# Altium PCB ide_podule-16bit.PcbDoc (part 1 of 2)
Units mm, origin at the board's own origin, x right, y up, seen from the top; angles counter-clockwise.
Board outline 101.85 x 63.25 mm, 2 copper layers (F.Cu, B.Cu); 33 components, 144 nets, 438 pads, 182 vias.
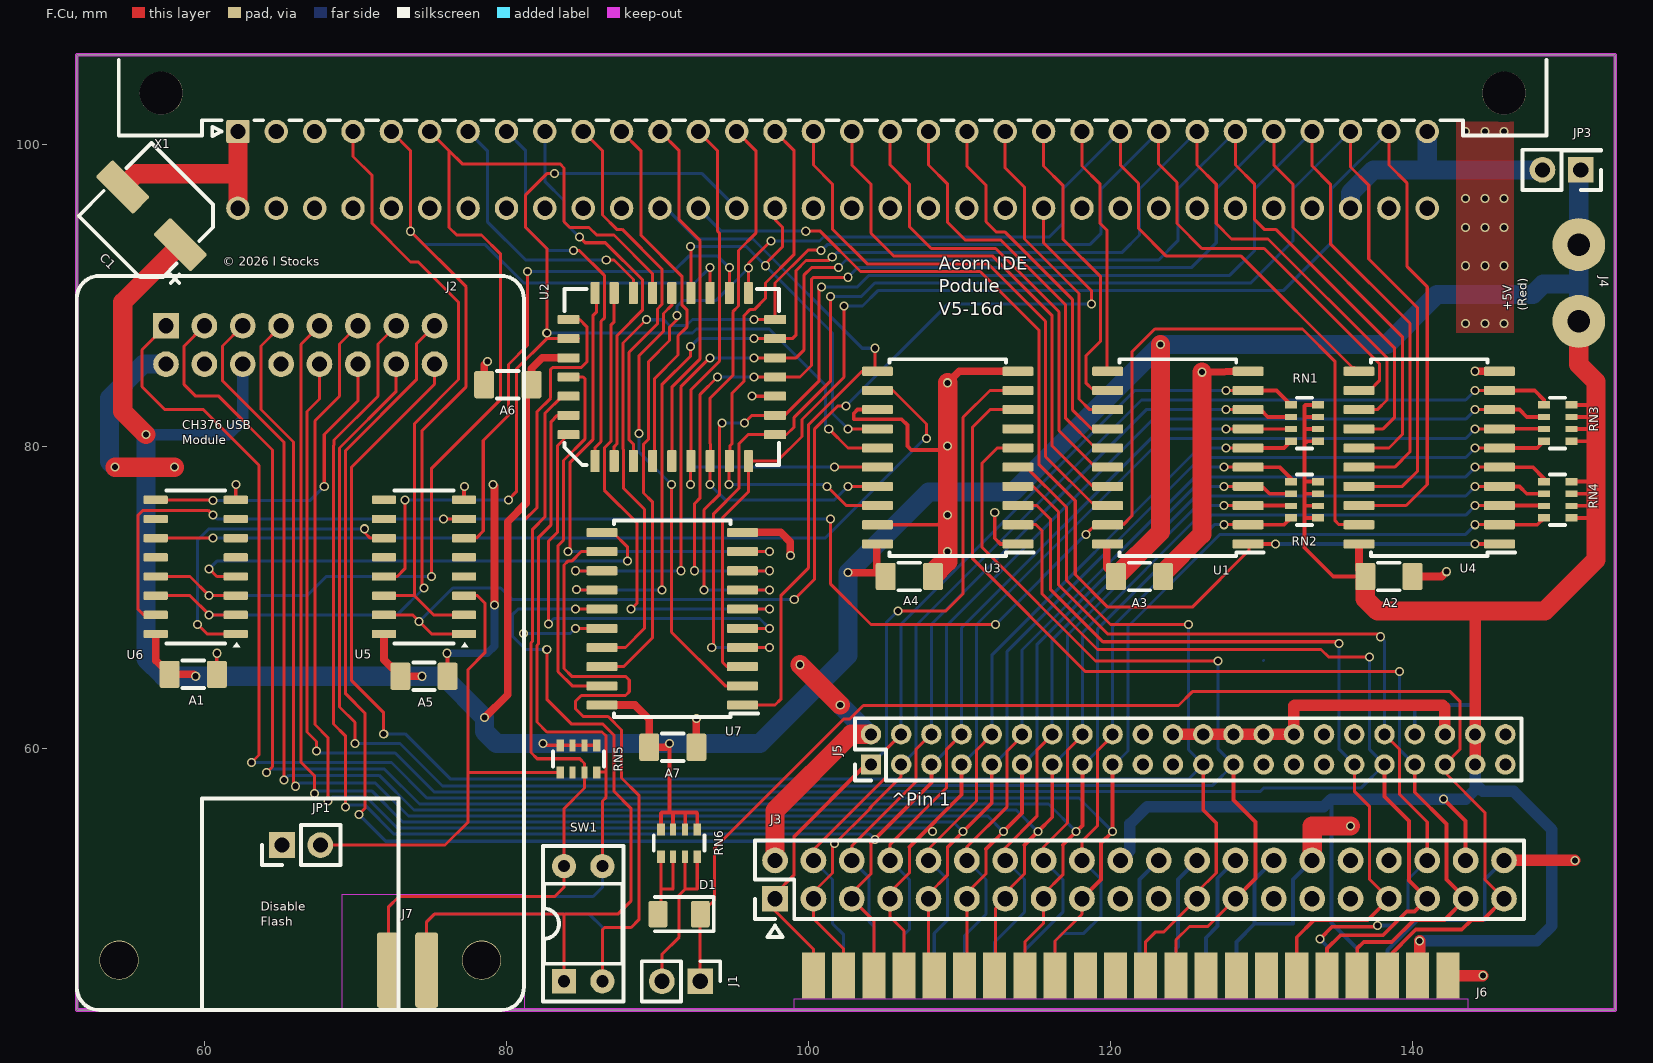
[diagram p0: F.Cu view]
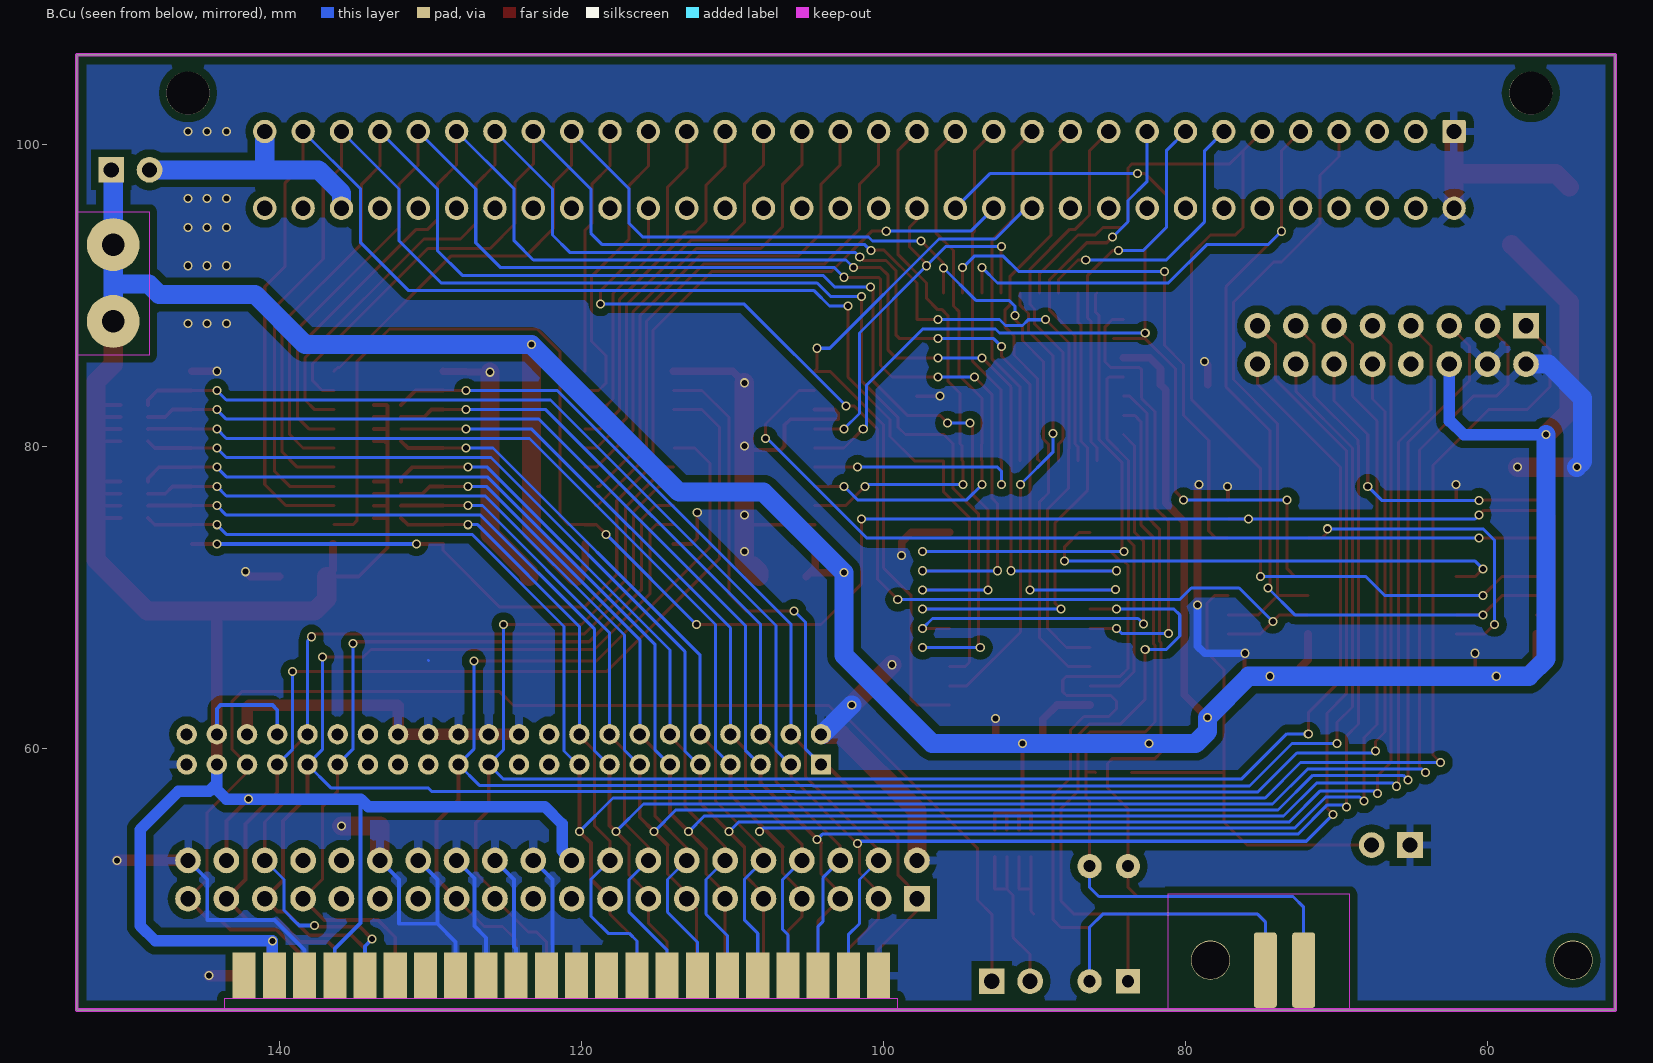
[diagram p1: B.Cu view, seen from below]

## Layer stack, top to bottom
F.Mask: solder mask 0.0102, Solder Resist, Dk 3.5
F.Cu: signal copper 0.0356
Dielectric 1: dielectric 0.32, FR-4, Dk 4.8
B.Cu: signal copper 0.0356
B.Mask: solder mask 0.0102, Solder Resist, Dk 3.5

## Board outline
51.562,42.684 153.416,42.684 153.416,105.93 51.562,105.93 51.562,42.684

## Design rules (kind name [scope] priority, off if disabled: settings)
Clearance "Clearence 0.508_Polygon" [InNamedPolygon('F.Cu-GND') OR InNamedPolygon('F.Cu-GND-1') OR InNamedPolygon('B.Cu-GND')] p1: gap=0.508 ignorepadtopadclearanceinfootprint=FALSE
Clearance "Clearence 0.2_NetClass" [InNetClass('Default') OR InNetClass('Power')] p2: gap=0.2 ignorepadtopadclearanceinfootprint=FALSE
MinimumSolderMaskSliver [All] p1: minsoldermaskwidth=0
PolygonConnect Polygon_B.Cu-GND_ConnectDirect [IsNamedPolygon('B.Cu-GND') vs IsVia] p1: connectstyle=Direct reliefconductorwidth=0.254 reliefentries=4 polygonreliefangle="90 Angle" airgapwidth=0.254
PolygonConnect Polygon_B.Cu-GND_ConnectRelief45 [IsNamedPolygon('B.Cu-GND') vs (IsThruPin or IsSMTPin) and (PadShape_AllLayers = 'Round')] p2: connectstyle=Relief reliefconductorwidth=0.508 reliefentries=4 polygonreliefangle="45 Angle" airgapwidth=0.508
PolygonConnect Polygon_B.Cu-GND_ConnectRelief90 [IsNamedPolygon('B.Cu-GND') vs (IsThruPin or IsSMTPin) and (PadShape_AllLayers <> 'Round')] p3: connectstyle=Relief reliefconductorwidth=0.508 reliefentries=4 polygonreliefangle="90 Angle" airgapwidth=0.508
PolygonConnect Polygon_F.Cu-GND-1_ConnectDirect [IsNamedPolygon('F.Cu-GND-1') vs IsVia] p4: connectstyle=Direct reliefconductorwidth=0.254 reliefentries=4 polygonreliefangle="90 Angle" airgapwidth=0.254
PolygonConnect Polygon_F.Cu-GND-1_ConnectRelief45 [IsNamedPolygon('F.Cu-GND-1') vs (IsThruPin or IsSMTPin) and (PadShape_AllLayers = 'Round')] p5: connectstyle=Relief reliefconductorwidth=0.508 reliefentries=4 polygonreliefangle="45 Angle" airgapwidth=0.508
PolygonConnect Polygon_F.Cu-GND-1_ConnectRelief90 [IsNamedPolygon('F.Cu-GND-1') vs (IsThruPin or IsSMTPin) and (PadShape_AllLayers <> 'Round')] p6: connectstyle=Relief reliefconductorwidth=0.508 reliefentries=4 polygonreliefangle="90 Angle" airgapwidth=0.508
PolygonConnect Polygon_F.Cu-GND_ConnectDirect [IsNamedPolygon('F.Cu-GND') vs IsVia] p7: connectstyle=Direct reliefconductorwidth=0.254 reliefentries=4 polygonreliefangle="90 Angle" airgapwidth=0.254
PolygonConnect Polygon_F.Cu-GND_ConnectRelief45 [IsNamedPolygon('F.Cu-GND') vs (IsThruPin or IsSMTPin) and (PadShape_AllLayers = 'Round')] p8: connectstyle=Relief reliefconductorwidth=0.508 reliefentries=4 polygonreliefangle="45 Angle" airgapwidth=0.508
PolygonConnect Polygon_F.Cu-GND_ConnectRelief90 [IsNamedPolygon('F.Cu-GND') vs (IsThruPin or IsSMTPin) and (PadShape_AllLayers <> 'Round')] p9: connectstyle=Relief reliefconductorwidth=0.508 reliefentries=4 polygonreliefangle="90 Angle" airgapwidth=0.508
RoutingVias [All] p1: holewidth=0.711 width=1.27 viastyle="Through Hole" minholewidth=0.711 minwidth=1.27 maxholewidth=0.711 maxwidth=1.27
SilkToSilkClearance [All] p1: silktosilkclearance=0
SilkToSolderMaskClearance [IsPad] p1: minsilkscreentomaskgap=0 clearancetoexposedcopper=TRUE
SolderMaskExpansion [All] p1: expansion=0 istentingtop=FALSE
Width [All] p1: maxlimit=10 minlimit=0.254 preferedwidth=0.2 minimp=50.000000 maximp=50.000000 favimp=50.000000
27 further rules are at their usual default settings.

## Classes and differential pairs
net class Power: GND VCC
net class Default: BCS0 BD0 BD1 BD2 BD3 BD4 BD5 BD6 BD7 BD8 BD9 BD10 BD11 BD12 BD13 BD14 BD15 BLA2 BLA3 BLA4 C0 C1 C2 C3 C4 C5 C6 C7 CLK1 CS0 D0 D1 D2 D3 D4 D5 D6 D7 D8 D9 D10 D11 D12 D13 D14 D15 F_CE F_Enable LA2 LA3 LA4 LA5 LA6 LA7 LA8 LA9 LA10 LA11 LA12 LA13 LA14 LA15 Net-(D1-A) Net-(D1-K) Net-(J1-P2) Net-(J7-Pin_1) Net-(J7-Pin_3) Net-(U5B-O1) Net-(X1-Pin_a32) PR{slash}{\W\}\ U2K unconnected-(J2-Pin_8-Pad8) unconnected-(J3-P19-Pad19) unconnected-(J3-P21-Pad21) unconnected-(J3-P27-Pad27) unconnected-(J3-P29-Pad29) unconnected-(J3-P31-Pad31) unconnected-(J3-P32-Pad32) unconnected-(J3-P34-Pad34) unconnected-(J5-P19-Pad19) unconnected-(J5-P20-Pad20) unconnected-(J5-P21-Pad21) unconnected-(J5-P27-Pad27) unconnected-(J5-P29-Pad29) unconnected-(J5-P31-Pad31) unconnected-(J5-P32-Pad32) unconnected-(J5-P34-Pad34) unconnected-(J5-P44-Pad44) unconnected-(J6-P19-Pad19) unconnected-(J6-P20-Pad20) unconnected-(J6-P21-Pad21) unconnected-(J6-P27-Pad27) unconnected-(J6-P29-Pad29) unconnected-(J6-P31-Pad31) unconnected-(J6-P32-Pad32) unconnected-(J6-P34-Pad34) unconnected-(J6-P44-Pad44) unconnected-(RN5-R3.2-Pad6) unconnected-(U3-A5-Pad7) unconnected-(U5A-O0-Pad4) unconnected-(U5A-O1-Pad5) unconnected-(U5B-O0-Pad12) unconnected-(U5B-O2-Pad10) unconnected-(U5B-O3-Pad9) unconnected-(U6A-O1-Pad5) unconnected-(U6A-O2-Pad6) unconnected-(U6A-O3-Pad7) unconnected-(U6B-O0-Pad12) unconnected-(U6B-O2-Pad10) unconnected-(X1-Pin_c2-Padc2) unconnected-(X1-Pin_c3-Padc3) unconnected-(X1-Pin_c4-Padc4) unconnected-(X1-Pin_c5-Padc5) unconnected-(X1-Pin_c6-Padc6) unconnected-(X1-Pin_c7-Padc7) unconnected-(X1-Pin_c8-Padc8) unconnected-(X1-Pin_c9-Padc9) unconnected-(X1-Pin_c10-Padc10) unconnected-(X1-Pin_c11-Padc11) unconnected-(X1-Pin_c16-Padc16) unconnected-(X1-Pin_c17-Padc17) unconnected-(X1-Pin_c18-Padc18) unconnected-(X1-Pin_c19-Padc19) unconnected-(X1-Pin_c20-Padc20) unconnected-(X1-Pin_c21-Padc21) unconnected-(X1-Pin_c23-Padc23) unconnected-(X1-Pin_c24-Padc24) unconnected-(X1-Pin_c25-Padc25) unconnected-(X1-Pin_c26-Padc26) unconnected-(X1-Pin_c27-Padc27) unconnected-(X1-Pin_c28-Padc28) unconnected-(X1-Pin_c29-Padc29) unconnected-(X1-Pin_c31-Padc31) unconnected-(X1-Pin_c32-Padc32) {\B\I\O\R\D\}\ {\B\I\O\W\R\}\ {\I\O\R\D\}\ {\I\O\W\R\}\ {\P\S\}\ {\R\S\T\-\B\}\ {\R\S\T\}\ {\U\S\B\_\C\S\}\

## Components (designator, comment, footprint, x,y, rotation, side; value= is the part's Value field where it differs from the comment)
A1 "Comment" C_1206_3216Metric_Pad1.33x1.80mm_HandSolder 59.271,64.909 r0 top value=100n
A2 "Comment" C_1206_3216Metric_Pad1.33x1.80mm_HandSolder 138.43,71.386 r0 top value=100n
A3 "Comment" C_1206_3216Metric_Pad1.33x1.80mm_HandSolder 121.92,71.386 r0 top value=100n
A4 "Comment" C_1206_3216Metric_Pad1.33x1.80mm_HandSolder 106.68,71.386 r0 top value=100n
A5 "Comment" C_1206_3216Metric_Pad1.33x1.80mm_HandSolder 74.549,64.782 r0 top value=100n
A6 "Comment" C_1206_3216Metric_Pad1.33x1.80mm_HandSolder 80.099,84.086 r180 top value=100n
A7 "Comment" C_1206_3216Metric_Pad1.33x1.80mm_HandSolder 91.021,60.083 r0 top value=100n
C1 "Comment" CP_Elec_6.3x5.8 56.511,95.266 r135 top value="47uF 16V"
D1 "Comment" LED_1206_3216Metric 91.443,49.034 r180 top value=LED
J1 "Comment" PinHeader_1x02_P2.54mm_Vertical 92.837,44.589 r270 top value=CONN_01X02
J2 "Comment" CH376-mod 75.249,87.986 r180 top value=Conn_02x08_Odd_Even
J3 "Comment" PinHeader_2x20_P2.54mm_Vertical 97.79,50.05 r90 top value=CONN_02X20
J4 "Comment" SolderWirePad_2x_1-5mmDrill 151.003,90.817 r90 top value=CONN_01X01
J5 "Comment" PinHeader_2x22_P2.00mm_Vertical 104.14,58.94 r90 top value=CONN_02X22
J6 "Comment" IDE-edge-44pinC 99.568,46.494 r0 top value=CONN_02X22
J7 "Comment" "4 way edge" 72.187,47.866 r0 top value=Conn_01x04_Socket
JP1 "Comment" PinHeader_1x02_P2.54mm_Vertical 65.146,53.606 r90 top value=Jumper_NO_Small
JP3 "Comment" PinHeader_2x01_P2.54mm_Vertical 151.135,98.31 r180 top value=Jumper_NO_Small
RN1 "Comment" R_Array_Convex_4x0603 132.842,81.546 r0 top value=4K7
RN2 "Comment" R_Array_Convex_4x0603 132.842,76.466 r0 top value=4K7
RN3 "Comment" R_Array_Convex_4x0603 149.606,81.546 r0 top value=4K7
RN4 "Comment" R_Array_Convex_4x0603 149.606,76.466 r0 top value=4K7
RN5 "Comment" R_Array_Convex_4x0603 84.779,59.31 r270 top value=4K7
RN6 "Comment" R_Array_Convex_4x0603 91.44,53.733 r270 top value=680R
SW1 "Comment" DIP-4_W7.62mm_Socket 83.82,44.589 r90 top value=SW_DIP_x02
U1 "Comment" SOIC-20W_7.5x12.8mm_P1.27mm 124.46,79.26 r180 top value=74HC245
U2 "Comment" PLCC-32_11.4x14.0mm_P1.27mm 90.953,84.594 r90 top value=SST39SF010
U3 "Comment" SOIC-20W_7.5x12.8mm_P1.27mm 109.22,79.26 r180 top value=74HC245
U4 "Comment" SOIC-20W_7.5x12.8mm_P1.27mm 141.097,79.26 r180 top value=74HC245
U5 "Comment" STC_SOP-16_3.9x9.9mm_P1.27mm 74.549,72.021 r180 top value=74HC139
U6 "Comment" STC_SOP-16_3.9x9.9mm_P1.27mm 59.436,72.021 r180 top value=74HC139
U7 "Comment" SOIC-20W_7.5x12.8mm_P1.27mm 90.981,68.592 r180 top value=74HC273
X1 "Comment" DIN41612_C_2x32_Male_Horizontal_THT 62.23,100.85 r0 top value=DIN41612_02x32_AC

## Footprints (in the part's own frame and the unit in brackets; to place one, negate y for a bottom-side part, rotate by r counter-clockwise, add the part's x,y. Pads: shape width x height; smd on the part's side, far side on the other; paste and mask are expansions set on the pad)
"4 way edge" [mm]
  rrect25% 1.524x5 smd paste-5 mask+0: 1(0,-2.54) 2(2.54,-2.54)
  rrect25% 1.524x5 smd far side paste-5 mask+0: 3(0,-2.54) 4(2.54,-2.54)
C_1206_3216Metric_Pad1.33x1.80mm_HandSolder [mm]
  rrect19% 1.325x1.8 smd mask+0: 1(-1.562,0) 2(1.562,0)
  silkscreen extent -0.71,-0.91 0.71,0.91
CH376-mod [mm]
  rect 1.7x1.7 hole 1 paste-2539.97 mask+0: 1(17.78,0)
  round 1.7 hole 1 paste-2539.97 mask+0: 2(17.78,2.54) 3(15.24,0) 4(15.24,2.54) 5(12.7,0) 6(12.7,2.54) 7(10.16,0) 8(10.16,2.54) 9(7.62,0) 10(7.62,2.54) 11(5.08,0) 12(5.08,2.54) 13(2.54,0) 14(2.54,2.54) 15(0,0) 16(0,2.54)
  round 2.6 hole 2.5 paste-2539.97 mask+0: M(-3.11,42) M(20.89,42)
  silkscreen extent -5.91,-3.3 23.69,45.3
CP_Elec_6.3x5.8 [mm]
  rrect16% 3.5x1.6 smd mask+0: 1(-2.7,0) 2(2.7,0)
  silkscreen extent -4.44,-3.41 3.41,3.41
DIN41612_C_2x32_Male_Horizontal_THT [mm]
  rrect16% 1.55x1.55 hole 1 paste-2539.97 mask+0: a1(0,0)
  round 1.55 hole 1 paste-2539.97 mask+0: a2(2.54,0) a3(5.08,0) a4(7.62,0) a5(10.16,0) a6(12.7,0) a7(15.24,0) a8(17.78,0) a9(20.32,0) a10(22.86,0) a11(25.4,0) a12(27.94,0) a13(30.48,0) a14(33.02,0) a15(35.56,0) a16(38.1,0) a17(40.64,0) a18(43.18,0) a19(45.72,0) a20(48.26,0) a21(50.8,0) a22(53.34,0) a23(55.88,0) a24(58.42,0) a25(60.96,0) a26(63.5,0) a27(66.04,0) a28(68.58,0) a29(71.12,0) a30(73.66,0) a31(76.2,0) a32(78.74,0) c1(0,-5.08) c2(2.54,-5.08) c3(5.08,-5.08) c4(7.62,-5.08) c5(10.16,-5.08) c6(12.7,-5.08) c7(15.24,-5.08) c8(17.78,-5.08) c9(20.32,-5.08) c10(22.86,-5.08) c11(25.4,-5.08) c12(27.94,-5.08) c13(30.48,-5.08) c14(33.02,-5.08) c15(35.56,-5.08) c16(38.1,-5.08) c17(40.64,-5.08) c18(43.18,-5.08) c19(45.72,-5.08) c20(48.26,-5.08) c21(50.8,-5.08) c22(53.34,-5.08) c23(55.88,-5.08) c24(58.42,-5.08) c25(60.96,-5.08) c26(63.5,-5.08) c27(66.04,-5.08) c28(68.58,-5.08) c29(71.12,-5.08) c30(73.66,-5.08) c31(76.2,-5.08) c32(78.74,-5.08)
  round 2.85 hole 2.85 paste-2539.97 mask+0: Un1(-5.08,2.54) Un2(83.82,2.54)
  silkscreen extent -7.89,-0.3 86.63,4.74
DIP-4_W7.62mm_Socket [mm]
  rect 1.6x1.6 hole 0.8 paste-2539.97 mask+0: 1(0,0)
  rrect100% 1.6x1.6 hole 0.8 paste-2539.97 mask+0: 2(0,-2.54) 3(7.62,-2.54) 4(7.62,0)
  silkscreen extent -1.33,-3.93 8.95,1.39
IDE-edge-44pinC [mil]
  rect 60x120 smd paste-120 mask+0: 1(30,-60) 3(108.74,-60) 5(187.48,-60) 7(266.22,-60) 9(344.96,-60) 11(423.7,-60) 13(502.44,-60) 15(581.18,-60) 17(659.92,-60) 19(738.66,-60) 21(817.4,-60) 23(896.14,-60) 25(974.88,-60) 27(1053.62,-60) 29(1132.36,-60) 31(1211.1,-60) 33(1289.84,-60) 35(1368.58,-60) 37(1447.32,-60) 39(1526.06,-60) 41(1604.8,-60) 43(1683.54,-60)
  rect 60x120 smd far side paste-120 mask+0: 2(30,-60) 4(108.74,-60) 6(187.48,-60) 8(266.22,-60) 10(344.96,-60) 12(423.7,-60) 14(502.44,-60) 16(581.18,-60) 18(659.92,-60) 20(738.66,-60) 22(817.4,-60) 24(896.14,-60) 26(974.88,-60) 28(1053.62,-60) 30(1132.36,-60) 32(1211.1,-60) 34(1289.84,-60) 36(1368.58,-60) 38(1447.32,-60) 40(1526.06,-60) 42(1604.8,-60) 44(1683.54,-60)
LED_1206_3216Metric [mm]
  rrect20% 1.25x1.75 smd mask+0: 1(-1.4,0) 2(1.4,0)
  silkscreen extent -2.28,-1.13 1.6,1.13
PinHeader_1x02_P2.54mm_Vertical [mm]
  rect 1.7x1.7 hole 1 paste-2539.97 mask+0: 1(0,0)
  rrect100% 1.7x1.7 hole 1 paste-2539.97 mask+0: 2(0,-2.54)
  silkscreen extent -1.33,-3.87 1.33,1.33
PinHeader_2x01_P2.54mm_Vertical [mm]
  rect 1.7x1.7 hole 1 paste-2539.97 mask+0: 1(0,0)
  rrect100% 1.7x1.7 hole 1 paste-2539.97 mask+0: 2(2.54,0)
  silkscreen extent -1.33,-1.33 3.87,1.33
PinHeader_2x20_P2.54mm_Vertical [mm]
  rect 1.7x1.7 hole 1 paste-2539.97 mask+0: 1(0,0)
  rrect100% 1.7x1.7 hole 1 paste-2539.97 mask+0: 2(2.54,0) 3(0,-2.54) 4(2.54,-2.54) 5(0,-5.08) 6(2.54,-5.08) 7(0,-7.62) 8(2.54,-7.62) 9(0,-10.16) 10(2.54,-10.16) 11(0,-12.7) 12(2.54,-12.7) 13(0,-15.24) 14(2.54,-15.24) 15(0,-17.78) 16(2.54,-17.78) 17(0,-20.32) 18(2.54,-20.32) 19(0,-22.86) 20(2.54,-22.86) 21(0,-25.4) 22(2.54,-25.4) 23(0,-27.94) 24(2.54,-27.94) 25(0,-30.48) 26(2.54,-30.48) 27(0,-33.02) 28(2.54,-33.02) 29(0,-35.56) 30(2.54,-35.56) 31(0,-38.1) 32(2.54,-38.1) 33(0,-40.64) 34(2.54,-40.64) 35(0,-43.18) 36(2.54,-43.18) 37(0,-45.72) 38(2.54,-45.72) 39(0,-48.26) 40(2.54,-48.26)
  silkscreen extent -1.33,-49.59 3.87,1.33
PinHeader_2x22_P2.00mm_Vertical [mm]
  rect 1.35x1.35 hole 0.8 paste-2539.97 mask+0: 1(0,0)
  rrect100% 1.35x1.35 hole 0.8 paste-2539.97 mask+0: 2(2,0) 3(0,-2) 4(2,-2) 5(0,-4) 6(2,-4) 7(0,-6) 8(2,-6) 9(0,-8) 10(2,-8) 11(0,-10) 12(2,-10) 13(0,-12) 14(2,-12) 15(0,-14) 16(2,-14) 17(0,-16) 18(2,-16) 19(0,-18) 20(2,-18) 21(0,-20) 22(2,-20) 23(0,-22) 24(2,-22) 25(0,-24) 26(2,-24) 27(0,-26) 28(2,-26) 29(0,-28) 30(2,-28) 31(0,-30) 32(2,-30) 33(0,-32) 34(2,-32) 35(0,-34) 36(2,-34) 37(0,-36) 38(2,-36) 39(0,-38) 40(2,-38) 41(0,-40) 42(2,-40) 43(0,-42) 44(2,-42)
  silkscreen extent -1.06,-43.06 3.06,1.06
PLCC-32_11.4x14.0mm_P1.27mm [mm]
  rrect25% 0.6x1.475 smd mask+0: 1(0,6.837) 2(-1.27,6.837) 3(-2.54,6.837) 4(-3.81,6.837) 14(-3.81,-6.837) 15(-2.54,-6.837) 16(-1.27,-6.837) 17(0,-6.837) 18(1.27,-6.837) 19(2.54,-6.837) 20(3.81,-6.837) 30(3.81,6.837) 31(2.54,6.837) 32(1.27,6.837)
  rrect25% 1.475x0.6 smd mask+0: 5(-5.563,5.08) 6(-5.563,3.81) 7(-5.563,2.54) 8(-5.563,1.27) 9(-5.563,0) 10(-5.563,-1.27) 11(-5.563,-2.54) 12(-5.563,-3.81) 13(-5.563,-5.08) 21(5.563,-5.08) 22(5.563,-3.81) 23(5.563,-2.54) 24(5.563,-1.27) 25(5.563,0) 26(5.563,1.27) 27(5.563,2.54) 28(5.563,3.81) 29(5.563,5.08)
  silkscreen extent -5.82,-7.09 5.82,7.09
R_Array_Convex_4x0603 [mm]
  rect 0.8x0.5 smd mask+0: 1(-0.9,1.2) 4(-0.9,-1.2) 5(0.9,-1.2) 8(0.9,1.2)
  rect 0.8x0.4 smd mask+0: 2(-0.9,0.4) 3(-0.9,-0.4) 6(0.9,-0.4) 7(0.9,0.4)
  silkscreen extent -0.5,-1.68 0.5,1.68
SOIC-20W_7.5x12.8mm_P1.27mm [mm]
  rrect25% 2.05x0.6 smd mask+0: 1(-4.65,5.715) 2(-4.65,4.445) 3(-4.65,3.175) 4(-4.65,1.905) 5(-4.65,0.635) 6(-4.65,-0.635) 7(-4.65,-1.905) 8(-4.65,-3.175) 9(-4.65,-4.445) 10(-4.65,-5.715) 11(4.65,-5.715) 12(4.65,-4.445) 13(4.65,-3.175) 14(4.65,-1.905) 15(4.65,-0.635) 16(4.65,0.635) 17(4.65,1.905) 18(4.65,3.175) 19(4.65,4.445) 20(4.65,5.715)
  silkscreen extent -5.68,-6.51 3.86,6.51
SolderWirePad_2x_1-5mmDrill [mm]
  round 3.5 hole 1.501 paste-2539.97 mask+0: 1(-2.54,0) 1(2.54,0)
STC_SOP-16_3.9x9.9mm_P1.27mm [mm]
  rrect25% 1.6x0.55 smd mask+0: 1(-2.65,4.445) 2(-2.65,3.175) 3(-2.65,1.905) 4(-2.65,0.635) 5(-2.65,-0.635) 6(-2.65,-1.905) 7(-2.65,-3.175) 8(-2.65,-4.445) 9(2.65,-4.445) 10(2.65,-3.175) 11(2.65,-1.905) 12(2.65,-0.635) 13(2.65,0.635) 14(2.65,1.905) 15(2.65,3.175) 16(2.65,4.445)
  silkscreen extent -2.94,-5.06 1.95,5.31

## Part data
A1 A2 A3 A4 A5 A6 A7: library part C_1206_3216Metric_Pad1.33x1.80mm_HandSolder, "Capacitor SMD 1206 (3216 Metric), square (rectangular) end terminal, IPC_7351 nominal with elongated pad for handsoldering. (Body size source: IPC-SM-782 page 76, https://www.pcb-3d.com/wordpress/wp-content/uploads/ipc-sm-782a_amendment_1_and_2.pdf), generated with kicad-footprint-generator", Footprint=Capacitor_SMD:C_1206_3216Metric_Pad1.33x1.80mm_HandSolder, ki_fp_filters=C_*
C1: library part CP_Elec_6.3x5.8, "SMD capacitor, aluminum electrolytic, Nichicon, 6.3x5.8mm", Footprint=Capacitor_SMD:CP_Elec_6.3x5.8, ki_fp_filters=CP_*
D1: library part LED_1206_3216Metric, "LED SMD 1206 (3216 Metric), square (rectangular) end terminal, IPC_7351 nominal, (Body size source: http://www.tortai-tech.com/upload/download/2011102023233369053.pdf), generated with kicad-footprint-generator", Footprint=LED_SMD:LED_1206_3216Metric, ki_fp_filters="LED* LED_SMD:* LED_THT:*"
J1 JP1: library part PinHeader_1x02_P2.54mm_Vertical, "Through hole straight pin header, 1x02, 2.54mm pitch, single row", Footprint=Connector_PinHeader_2.54mm:PinHeader_1x02_P2.54mm_Vertical
  J1: ki_fp_filters="Pin_Header_Straight_1X* Pin_Header_Angled_1X* Socket_Strip_Straight_1X* Socket_Strip_Angled_1X*"
  JP1: ki_fp_filters=SolderJumper*Open*
J2: library part CH376-mod, Footprint=Library:CH376-mod, Description="Generic connector, double row, 02x08, odd/even pin numbering scheme (row 1 odd numbers, row 2 even numbers), script generated (kicad-library-utils/schlib/autogen/connector/)", ki_fp_filters=Connector*:*_2x??_*
J3: library part PinHeader_2x20_P2.54mm_Vertical, "Through hole straight pin header, 2x20, 2.54mm pitch, double rows", Footprint=Connector_PinHeader_2.54mm:PinHeader_2x20_P2.54mm_Vertical, ki_fp_filters="Pin_Header_Straight_2X* Pin_Header_Angled_2X* Socket_Strip_Straight_2X* Socket_Strip_Angled_2X* IDC_Header_Straight_*"
J4: library part SolderWirePad_2x_1-5mmDrill, Footprint=Library:SolderWirePad_2x_1-5mmDrill, ki_fp_filters="Pin_Header_Straight_1X* Pin_Header_Angled_1X* Socket_Strip_Straight_1X* Socket_Strip_Angled_1X*"
J5: library part PinHeader_2x22_P2.00mm_Vertical, "Through hole straight pin header, 2x22, 2.00mm pitch, double rows", Footprint=Connector_PinHeader_2.00mm:PinHeader_2x22_P2.00mm_Vertical, ki_fp_filters="Pin_Header_Straight_2X* Pin_Header_Angled_2X* Socket_Strip_Straight_2X* Socket_Strip_Angled_2X*"
J6: library part IDE-edge-44pinC, Footprint=Library:IDE-edge-44pinC, ki_fp_filters="Pin_Header_Straight_2X* Pin_Header_Angled_2X* Socket_Strip_Straight_2X* Socket_Strip_Angled_2X*"
J7: library part "4 way edge", Footprint="Library:4 way edge", Description="Generic connector, single row, 01x04, script generated", ki_fp_filters=Connector*:*_1x??_*
JP3: library part PinHeader_2x01_P2.54mm_Vertical, "Through hole straight pin header, 2x01, 2.54mm pitch, double rows", Footprint=Connector_PinHeader_2.54mm:PinHeader_2x01_P2.54mm_Vertical, ki_fp_filters=SolderJumper*Open*
RN1 RN2 RN3 RN4 RN5 RN6: library part R_Array_Convex_4x0603, "Chip Resistor Network, ROHM MNR14 (see mnr_g.pdf)", Footprint=Resistor_SMD:R_Array_Convex_4x0603, ki_fp_filters="DIP* SOIC* R*Array*Concave* R*Array*Convex*"
SW1: library part DIP-4_W7.62mm_Socket, "4-lead though-hole mounted DIP package, row spacing 7.62 mm (300 mils), Socket", Footprint=Package_DIP:DIP-4_W7.62mm_Socket, Description="2x DIP Switch, Single Pole Single Throw (SPST) switch, small symbol", ki_fp_filters=SW?DIP?x2*
U1 U3 U4 U7: library part SOIC-20W_7.5x12.8mm_P1.27mm, "SOIC, 20 Pin (JEDEC MS-013AC, https://www.analog.com/media/en/package-pcb-resources/package/233848rw_20.pdf), generated with kicad-footprint-generator ipc_gullwing_generator.py", Footprint=Package_SO:SOIC-20W_7.5x12.8mm_P1.27mm
  U7: Datasheet=https://assets.nexperia.com/documents/data-sheet/74AHC_AHCT273.pdf, ki_fp_filters="DIP?20* SO?20* SOIC?20*"
U2: library part PLCC-32_11.4x14.0mm_P1.27mm, "PLCC, 32 Pin (http://ww1.microchip.com/downloads/en/DeviceDoc/doc0015.pdf), generated with kicad-footprint-generator ipc_plcc_jLead_generator.py", Footprint=Package_LCC:PLCC-32_11.4x14.0mm_P1.27mm
U5 U6: library part STC_SOP-16_3.9x9.9mm_P1.27mm, "STC  SOP, 16 Pin (https://www.stcmicro.com/datasheet/STC15F2K60S2-en.pdf#page=156), generated with kicad-footprint-generator ipc_gullwing_generator.py", Footprint=Package_SO:STC_SOP-16_3.9x9.9mm_P1.27mm, Datasheet=http://www.ti.com/lit/gpn/sn74LS139, ki_fp_filters=DIP?16*
X1: library part DIN41612_C_2x32_Male_Horizontal_THT, "DIN41612 connector, type C, Horizontal, 3 rows 32 pins wide, https://www.erni-x-press.com/de/downloads/kataloge/englische_kataloge/erni-din41612-iec60603-2-e.pdf", Footprint=Connector_DIN:DIN41612_C_2x32_Male_Horizontal_THT, Description="DIN41612 connector, double row (AC), 02x32, script generated (kicad-library-utils/schlib/autogen/connector/)", ki_fp_filters=DIN41612*2x*

## Via types
v1: diameter 0.6, hole 0.4, F.Cu to B.Cu, tented both sides, 182 vias

## Nets (pads, with @x,y where several pads share a name; then routed paths per layer and width w, separated by ;. In a path a pad name is that pad's centre, name@x,y a point inside that pad or via, vN(x,y) a via of type N, cw(c..) or ccw(c..) an arc to the next point about the centre after c; other vN are vias at no path point)
BCS0: J3.37 J5.37 J6.37 U3.8 | length 70.8
  F.Cu w0.2: U3.8@113.92,82.435 112.014,82.435 110.871,81.292 110.871,72.556 118.325,65.102 v1(139.121,65.102)
  F.Cu w0.254: J6.37@136.33,44.97 136.33,46.748 136.765,47.183 138.618,47.183 140.088,48.653 142.113,48.653 J3.37@143.51,50.05 142.24,51.32 142.24,55.003 140.14,57.103 J5.37@140.14,58.94
  B.Cu w0.2: v1(139.121,65.102) 139.121,59.959 J5.37@140.14,58.94
BD0: U2.13 U4.18 U7.3 X1.a31 | length 102
  F.Cu w0.2: U7.3@95.631,65.417 94.606,65.417 94.306,65.717 94.306,75.268 96.033,76.994 U2.13@96.033,79.031 97.942,79.031 99.568,80.657 99.568,81.788 102.362,84.582 v1(102.362,89.293) ; U4.18@136.397,76.085 139.573,76.085 140.97,77.482 140.97,90.563 139.636,91.896 139.636,97.421 138.43,98.627 X1.a31@138.43,100.85
  B.Cu w0.2: v1(102.362,89.293) 103.58,89.293 104.596,90.309 131.445,90.309 134.62,93.484 134.62,97.04 X1.a31@138.43,100.85
BD1: U2.14 U4.17 U7.4 X1.a30 | length 103.2
  F.Cu w0.2: v1(93.599,66.687) 93.726,66.814 93.726,75.547 95.392,77.213 95.392,80.164 96.012,80.784 U2.14@97.79,80.784 98.552,80.784 99.06,81.292 99.06,81.927 101.473,84.34 v1(101.473,89.928) ; U7.4@95.631,66.687 v1(97.409,66.687) ; X1.a30@135.89,100.85 135.89,98.5 137.096,97.294 137.096,92.404 140.335,89.166 140.335,78.371 139.319,77.355 U4.17@136.397,77.355
  B.Cu w0.2: v1(93.599,66.687) v1(97.409,66.687) ; v1(101.473,89.928) 103.505,89.928 104.394,90.817 129.286,90.817 132.08,93.611 132.08,97.04 X1.a30@135.89,100.85
BD2: U2.15 U4.16 U7.7 X1.a29 | length 98.4
  F.Cu w0.2: v1(93.091,70.497) 93.091,75.799 94.122,76.83 94.122,81.383 v1(94.285,81.546) ; U7.7@95.631,70.497 v1(97.409,70.497) ; v1(95.758,81.546) 96.266,82.054 U2.15@97.79,82.054 98.425,82.054 100.711,84.34 100.711,90.421 v1(100.853,90.563) ; X1.a29@133.35,100.85 133.35,98.564 134.556,97.357 134.556,93.357 ; 134.556,93.42 139.827,88.15 139.827,79.641 138.811,78.625 U4.16@136.397,78.625
  B.Cu w0.2: v1(93.091,70.497) v1(97.409,70.497) ; v1(94.285,81.546) v1(95.758,81.546) ; v1(100.853,90.563) 103.251,90.563 104.013,91.325 127.889,91.325 129.54,92.976 129.54,97.04 X1.a29@133.35,100.85
BD3: U2.17 U4.15 U7.8 X1.a28 | length 96.1
  F.Cu w0.2: v1(92.456,71.767) 92.456,76.212 92.837,76.593 92.837,83.451 v1(93.98,84.594) ; U7.8@95.631,71.767 v1(97.409,71.767) ; v1(96.393,84.594) U2.17@97.79,84.594 99.441,84.594 100.203,85.356 100.203,91.071 100.33,91.198 v1(102.616,91.198) ; X1.a28@130.81,100.85 130.81,98.627 132.08,97.357 132.08,94.5 139.319,87.261 139.319,80.784 138.43,79.895 U4.15@136.397,79.895
  B.Cu w0.2: v1(92.456,71.767) v1(97.409,71.767) ; v1(93.98,84.594) v1(96.393,84.594) ; v1(102.616,91.198) 103.251,91.833 125.349,91.833 127,93.484 127,97.04 X1.a28@130.81,100.85
BD4: U2.18 U4.14 U7.13 X1.a27 | length 96
  F.Cu w0.2: v1(84.582,71.767) U7.13@86.331,71.767 ; v1(91.567,71.767) 91.567,77.609 91.552,77.623 91.552,83.944 v1(93.472,85.864) ; v1(96.393,85.864) U2.18@97.79,85.864 99.187,85.864 99.695,86.372 99.695,91.325 100.203,91.833 v1(101.981,91.833) ; X1.a27@128.27,100.85 128.27,98.627 129.54,97.357 129.54,95.008 130.175,94.373 130.937,94.373 138.811,86.499 138.811,81.927 138.049,81.165 U4.14@136.397,81.165
  B.Cu w0.2: v1(84.582,71.767) v1(91.567,71.767) ; v1(93.472,85.864) v1(96.393,85.864) ; v1(101.981,91.833) 102.489,92.341 123.19,92.341 124.46,93.611 124.46,97.04 X1.a27@128.27,100.85
BD5: U2.19 U4.13 U7.14 X1.a26 | length 94.5
  F.Cu w0.2: v1(84.655,70.534) 84.692,70.497 U7.14@86.331,70.497 ; v1(90.297,70.497) 90.297,84.086 92.202,85.991 v1(92.202,86.626) ; v1(96.393,87.134) U2.19@97.79,87.134 98.933,87.134 99.187,87.388 99.187,91.648 99.845,92.306 101.349,92.306 v1(101.578,92.535) ; X1.a26@125.73,100.85 125.73,98.627 127,97.357 127,94.754 128.016,93.738 130.429,93.738 138.303,85.864 138.303,83.07 137.668,82.435 U4.13@136.397,82.435
  B.Cu w0.2: v1(84.655,70.534) 84.692,70.497 v1(90.297,70.497) ; v1(92.202,86.626) 92.71,87.134 v1(96.393,87.134) ; v1(101.578,92.535) 101.892,92.849 120.777,92.849 121.92,93.992 121.92,97.04 X1.a26@125.73,100.85
BD6: U2.20 U4.12 U7.17 X1.a25 | length 94.2
  F.Cu w0.2: U7.17@86.331,66.687 87.884,66.687 89.154,67.957 89.154,75.831 87.757,77.228 87.757,79.795 87.723,79.829 87.723,86.846 v1(89.281,88.404) ; v1(96.393,88.404) U2.20@97.79,88.404 97.79,90.817 99.968,92.995 100.545,92.995 100.584,92.956 v1(100.84,92.956) ; X1.a25@123.19,100.85 123.19,98.691 124.396,97.484 124.396,94.754 126.047,93.103 130.175,93.103 137.795,85.483 137.795,84.34 137.16,83.705 U4.12@136.397,83.705
  B.Cu w0.2: v1(89.281,88.404) 89.3,88.385 90.424,88.385 90.801,88.008 91.933,88.008 92.329,88.404 v1(96.393,88.404) ; v1(100.84,92.956) 101.241,93.357 118.618,93.357 119.38,94.119 119.38,97.04 X1.a25@123.19,100.85
BD7: U2.21 U4.11 U7.18 X1.a24 | length 89.9
  F.Cu w0.2: U7.18@86.331,65.417 87.757,65.417 89.662,67.322 89.662,76.339 89.082,76.918 89.082,80.149 89.423,80.489 89.423,85.625 90.805,87.007 90.805,87.896 91.313,88.404 v1(91.313,88.658) ; U2.21@96.033,90.156 96.033,92.119 v1(97.51,93.596) ; X1.a24@120.65,100.85 120.65,98.627 121.856,97.421 121.856,94.436 123.698,92.595 128.651,92.595 136.017,85.229 136.143,85.229 U4.11@136.397,84.975
  B.Cu w0.2: v1(91.313,88.658) 91.313,89.293 91.694,89.674 93.888,89.674 v1(96.033,91.818) ; v1(97.51,93.596) 100.726,93.596 100.995,93.865 115.951,93.865 116.84,94.754 116.84,97.04 X1.a24@120.65,100.85
BD8: U1.11 X1.a23 | length 16.6
  F.Cu w0.2: X1.a23@118.11,100.85 118.11,98.564 119.316,97.357 119.316,94.754 119.76,94.31 U1.11@119.76,84.975
BD9: U1.12 X1.a22 | length 20.2
  F.Cu w0.2: X1.a22@115.57,100.85 115.57,98.564 116.84,97.294 116.84,93.738 119.345,91.233 119.345,86.972 118.364,85.991 118.364,84.213 118.872,83.705 U1.12@119.76,83.705
BD10: U1.13 X1.a21 | length 21.9
  F.Cu w0.2: X1.a21@113.03,100.85 113.03,98.437 114.3,97.167 114.3,93.738 117.919,90.118 117.919,83.133 118.618,82.435 U1.13@119.76,82.435
BD11: U1.14 X1.a20 | length 24.5
  F.Cu w0.2: X1.a20@110.49,100.85 110.49,98.564 111.76,97.294 111.76,94.881 112.459,94.182 113.03,94.182 117.475,89.737 117.475,82.435 118.745,81.165 U1.14@119.76,81.165
BD12: U1.15 X1.a19 | length 27.7
  F.Cu w0.2: X1.a19@107.95,100.85 107.95,98.627 109.22,97.357 109.22,94.817 110.363,93.674 112.712,93.674 117.03,89.356 117.03,81.863 118.999,79.895 U1.15@119.76,79.895
BD13: U1.16 X1.a18 | length 31.1
  F.Cu w0.2: X1.a18@105.41,100.85 105.41,98.627 106.68,97.357 106.68,94.563 108.14,93.103 112.395,93.103 116.586,88.912 116.586,81.038 118.999,78.625 U1.16@119.76,78.625
BD14: U1.17 X1.a17 | length 34.1
  F.Cu w0.2: X1.a17@102.87,100.85 102.87,98.627 104.14,97.357 104.14,94.119 105.664,92.595 112.204,92.595 116.141,88.658 116.141,80.022 118.808,77.355 U1.17@118.935,77.355
BD15: U1.18 X1.a16 | length 37.3
  F.Cu w0.2: X1.a16@100.33,100.85 100.33,98.627 101.6,97.357 101.6,94.373 103.886,92.087 111.887,92.087 115.697,88.277 115.697,79.323 118.935,76.085 U1.18@119.062,76.085
BLA2: J2.10 J3.35 J5.35 J6.35 U3.2 | length 155.5
  F.Cu w0.2: v1(67.437,59.829) 67.437,60.464 66.802,61.099 66.802,82.308 67.629,83.135 J2.10@67.629,85.446 ; U3.2@113.92,74.815 115.062,74.815 115.458,74.419 115.458,70.238 119.136,66.56 133.939,66.56 134.447,66.052 137.145,66.052 v1(137.16,66.067)
  F.Cu w0.254: J6.35@134.33,44.97 134.33,46.748 135.219,47.637 138.049,47.637 139.612,49.2 140.12,49.2 J3.35@140.97,50.05 139.763,51.256 139.763,55.193 138.14,56.817 J5.35@138.14,58.94
  B.Cu w0.2: v1(67.437,59.829) 67.564,59.702 72.644,59.702 75.222,57.124 105.868,57.124 105.909,57.165 129.924,57.165 130.156,57.397 136.597,57.397 J5.35@138.14,58.94 137.16,59.92 v1(137.16,66.067)
BLA3: J3.33 J5.33 J6.33 U3.3 | length 55.7
  F.Cu w0.2: U3.3@113.92,76.085 115.126,76.085 116.012,75.199 116.012,70.543 119.487,67.068 135.011,67.068 v1(135.138,66.941) ; J5.33@136.14,58.94 136.14,57.166 137.16,56.146 137.16,51.32 J3.33@138.43,50.05
  F.Cu w0.254: J6.33@132.33,44.97 132.33,47.506 133.477,48.653 137.033,48.653 J3.33@138.43,50.05
  B.Cu w0.2: v1(135.138,66.941) 135.138,59.942 J5.33@136.14,58.94
BLA4: J3.36 J5.36 J6.36 U3.4 | length 60.1
  F.Cu w0.2: U3.4@113.92,77.355 114.871,77.355 116.556,75.671 116.556,70.832 119.812,67.576 137.688,67.576 v1(137.866,67.398) ; J5.36@138.14,60.94 138.144,60.94 139.129,59.956 139.129,56.971 140.97,55.13 J3.36@140.97,52.59
  F.Cu w0.254: v1(133.858,47.383) 134.674,48.199 137.595,48.199 v1(137.668,48.272)
  B.Cu w0.2: v1(137.866,67.398) 138.14,67.124 J5.36@138.14,60.94 ; 138.811,48.399 139.7,49.288 139.7,51.32 J3.36@140.97,52.59
  B.Cu w0.254: v1(133.858,47.383) 134.33,46.911 J6.36@134.33,44.97 ; v1(137.668,48.272) 138.684,48.272 138.811,48.399
C0: U2.25 U7.2 | length 30.4
  F.Cu w0.2: v1(88.773,80.84) 88.773,85.991 90.405,87.623 90.405,88.796 90.953,89.344 U2.25@90.953,90.156 ; v1(90.932,77.482) 90.932,67.703 94.488,64.147 U7.2@95.631,64.147
  B.Cu w0.2: v1(88.773,80.84) 88.773,79.641 v1(90.932,77.482)
C1: U2.4 U7.5 | length 29.9
  F.Cu w0.2: v1(82.793,68.257) 82.793,73.724 83.381,74.313 83.381,80.05 U2.4@84.115,80.784 ; U7.5@95.631,67.957 v1(97.409,67.957)
  B.Cu w0.2: v1(82.793,68.257) 83.143,68.607 96.759,68.607 v1(97.409,67.957)
C2: U2.28 U7.6 | length 33.2
  F.Cu w0.2: U2.28@87.143,90.156 87.143,88.247 86.919,88.023 86.919,80.327 86.487,79.895 86.487,77.101 88.646,74.942 88.646,69.608 v1(88.265,69.227) ; U7.6@95.631,69.227 v1(97.409,69.227)
  B.Cu w0.2: v1(88.265,69.227) v1(97.409,69.227)
C3: U2.29 U7.9 | length 33.1
  F.Cu w0.2: v1(84.074,73.037) 84.201,73.164 84.201,78.926 85.725,80.45 85.725,88.658 85.979,88.912 85.979,90.05 U2.29@85.873,90.156 ; U7.9@95.631,73.037 v1(97.409,73.037)
  B.Cu w0.2: v1(84.074,73.037) v1(97.409,73.037)
C4: J7.4 SW1.2 U7.12 | length 61.3
  F.Cu w0.2: U7.12@86.331,73.037 84.963,73.037 84.328,72.402 84.074,72.402 83.82,72.148 83.82,65.29 84.328,64.782 87.884,64.782 88.138,64.528 88.138,63.766 87.884,63.512 84.963,63.512 84.582,63.131 84.582,62.623 85.09,62.115 86.741,62.115 87.63,61.226 87.63,58.051 88.773,56.908 88.773,48.653 88.265,48.145 86.502,48.145 86.36,48.003 SW1.2@86.36,44.589
  B.Cu w0.2: J7.4@74.727,45.224 74.727,48.526 75.235,49.034 85.496,49.034 86.36,48.17 SW1.2@86.36,44.589
C5: J7.2 SW1.1 U7.15 | length 52.2
  F.Cu w0.2: J7.2@74.727,45.224 74.727,48.526 75.235,49.034 83.769,49.034 83.82,48.983 ; v1(82.677,66.56) 82.677,63.258 84.328,61.607 86.398,61.607 87.122,60.883 87.122,57.162 88.265,56.019 88.265,49.923 87.376,49.034 83.871,49.034 83.82,48.983 ; SW1.1@83.82,44.589 83.82,48.003 83.82,48.983 ; v1(84.582,69.227) U7.15@86.331,69.227
  B.Cu w0.2: v1(82.677,66.56) 81.28,66.56 80.391,67.449 80.391,68.846 80.772,69.227 v1(84.582,69.227)
C6: U2.30 U7.16 | length 29.9
  F.Cu w0.2: v1(81.124,67.622) 81.124,75.04 82.042,75.958 82.042,82.308 82.931,83.197 82.931,85.102 83.058,85.229 84.963,85.229 85.325,85.591 85.325,87.931 84.852,88.404 U2.30@84.115,88.404 ; v1(84.582,67.957) 84.963,67.957 U7.16@86.331,67.957
  B.Cu w0.2: v1(81.124,67.622) 84.247,67.622 v1(84.582,67.957)
C7: U2.1 U7.19 | length 24.6
  F.Cu w0.2: U2.1@84.115,84.594 85.09,84.594 85.217,84.467 85.217,80.508 83.781,79.072 83.781,73.791 83.42,73.429 83.42,65.085 84.358,64.147 U7.19@86.331,64.147
CLK1: U6.4 U7.11 | length 32.9
  F.Cu w0.2: v1(60.325,71.894) 60.833,71.386 U6.4@62.086,71.386 ; U7.11@86.331,74.307 87.064,74.307 88.011,73.36 v1(88.011,72.402)
  B.Cu w0.2: v1(60.325,71.894) 60.833,72.402 v1(88.011,72.402)
CS0: U3.12 U6.11 | length 58.9
  F.Cu w0.2: U6.11@56.786,73.926 v1(60.579,73.926) ; U3.12@104.57,83.705 105.595,83.705 107.823,81.477 v1(107.823,80.53)
  B.Cu w0.2: v1(60.579,73.926) 101.092,73.926 107.696,80.53 v1(107.823,80.53)
D0: J2.1 J3.17 J5.17 J6.17 RN4.4 U4.2 | length 149.1
  F.Cu w0.2: J2.1@57.469,87.986 55.88,86.397 55.88,83.959 57.404,82.435 59.944,82.435 63.627,78.752 63.627,59.575 v1(63.119,59.067) ; J6.17@116.33,44.97 116.33,47.254 118.11,49.034 J3.17@118.11,50.05 ; v1(144.145,74.815) U4.2@145.797,74.815
  F.Cu w0.254: J3.17@118.11,50.05 119.38,51.32 119.38,53.733 v1(120.14,54.493) J5.17@120.14,58.94 ; U4.2@145.797,74.815 148.255,74.815 RN4.4@148.706,75.266
  B.Cu w0.2: v1(63.119,59.067) 72.39,59.067 74.733,56.724 117.909,56.724 v1(120.14,54.493) ; J5.17@120.14,58.94 120.269,58.94 121.158,59.829 121.158,68.084 127.254,74.18 143.51,74.18 v1(144.145,74.815)
D1: J2.3 J3.15 J5.15 J6.15 RN4.3 U4.3 | length 146.8
  F.Cu w0.2: J2.3@60.009,87.986 58.674,86.651 58.674,84.086 59.436,83.324 60.96,83.324 64.516,79.768 64.516,58.798 v1(64.135,58.417) ; J6.15@114.33,44.97 114.33,47.184 115.57,48.424 J3.15@115.57,50.05 115.57,50.367 116.84,51.637 116.84,53.606 ; v1(144.145,76.085) U4.3@145.797,76.085
  F.Cu w0.254: 116.84,53.606 v1(117.729,54.495) 118.14,54.906 J5.15@118.14,58.94 ; U4.3@145.797,76.085 148.687,76.085 RN4.3@148.706,76.066
  B.Cu w0.2: v1(64.135,58.417) 64.346,58.628 71.94,58.628 74.244,56.324 115.9,56.324 v1(117.729,54.495) ; J5.15@118.237,58.94 119.126,59.829 119.126,67.893 126.682,75.45 143.51,75.45 v1(144.145,76.085)
D2: J2.5 J3.13 J5.13 J6.13 RN4.2 U4.4 | length 144.3
  F.Cu w0.2: J2.5@62.549,87.986 61.214,86.651 61.214,84.34 65.278,80.276 v1(65.278,57.909) ; J6.13@112.33,44.97 112.395,45.035 112.395,49.415 J3.13@113.03,50.05 113.03,50.431 114.3,51.701 114.3,53.606 ; v1(144.145,77.355) U4.4@145.797,77.355
  F.Cu w0.254: 114.3,53.606 v1(115.189,54.495) 116.14,55.446 J5.13@116.14,58.94 ; U4.4@145.797,77.355 147.066,77.355 147.555,76.866 RN4.2@148.706,76.866
  B.Cu w0.2: v1(65.278,57.909) 65.597,58.228 71.578,58.228 73.882,55.924 113.76,55.924 v1(115.189,54.495) ; J5.13@116.14,58.94 116.205,58.94 117.157,59.892 117.157,65.417 117.157,67.512 126.365,76.72 143.51,76.72 v1(144.145,77.355)